# Altium PCB LED_Control.PcbDoc (part 3 of 3)
Units mil, origin at the board's own origin, x right, y up, seen from the top; angles counter-clockwise.
Board outline 2900 x 5000 mil, 4 copper layers (Top Layer, GND1, GND2, Bottom Layer), stack 51.864 mil thick; 163 components, 141 nets, 650 pads, 368 vias.
Unrouted connection lines stored in the file: 67.
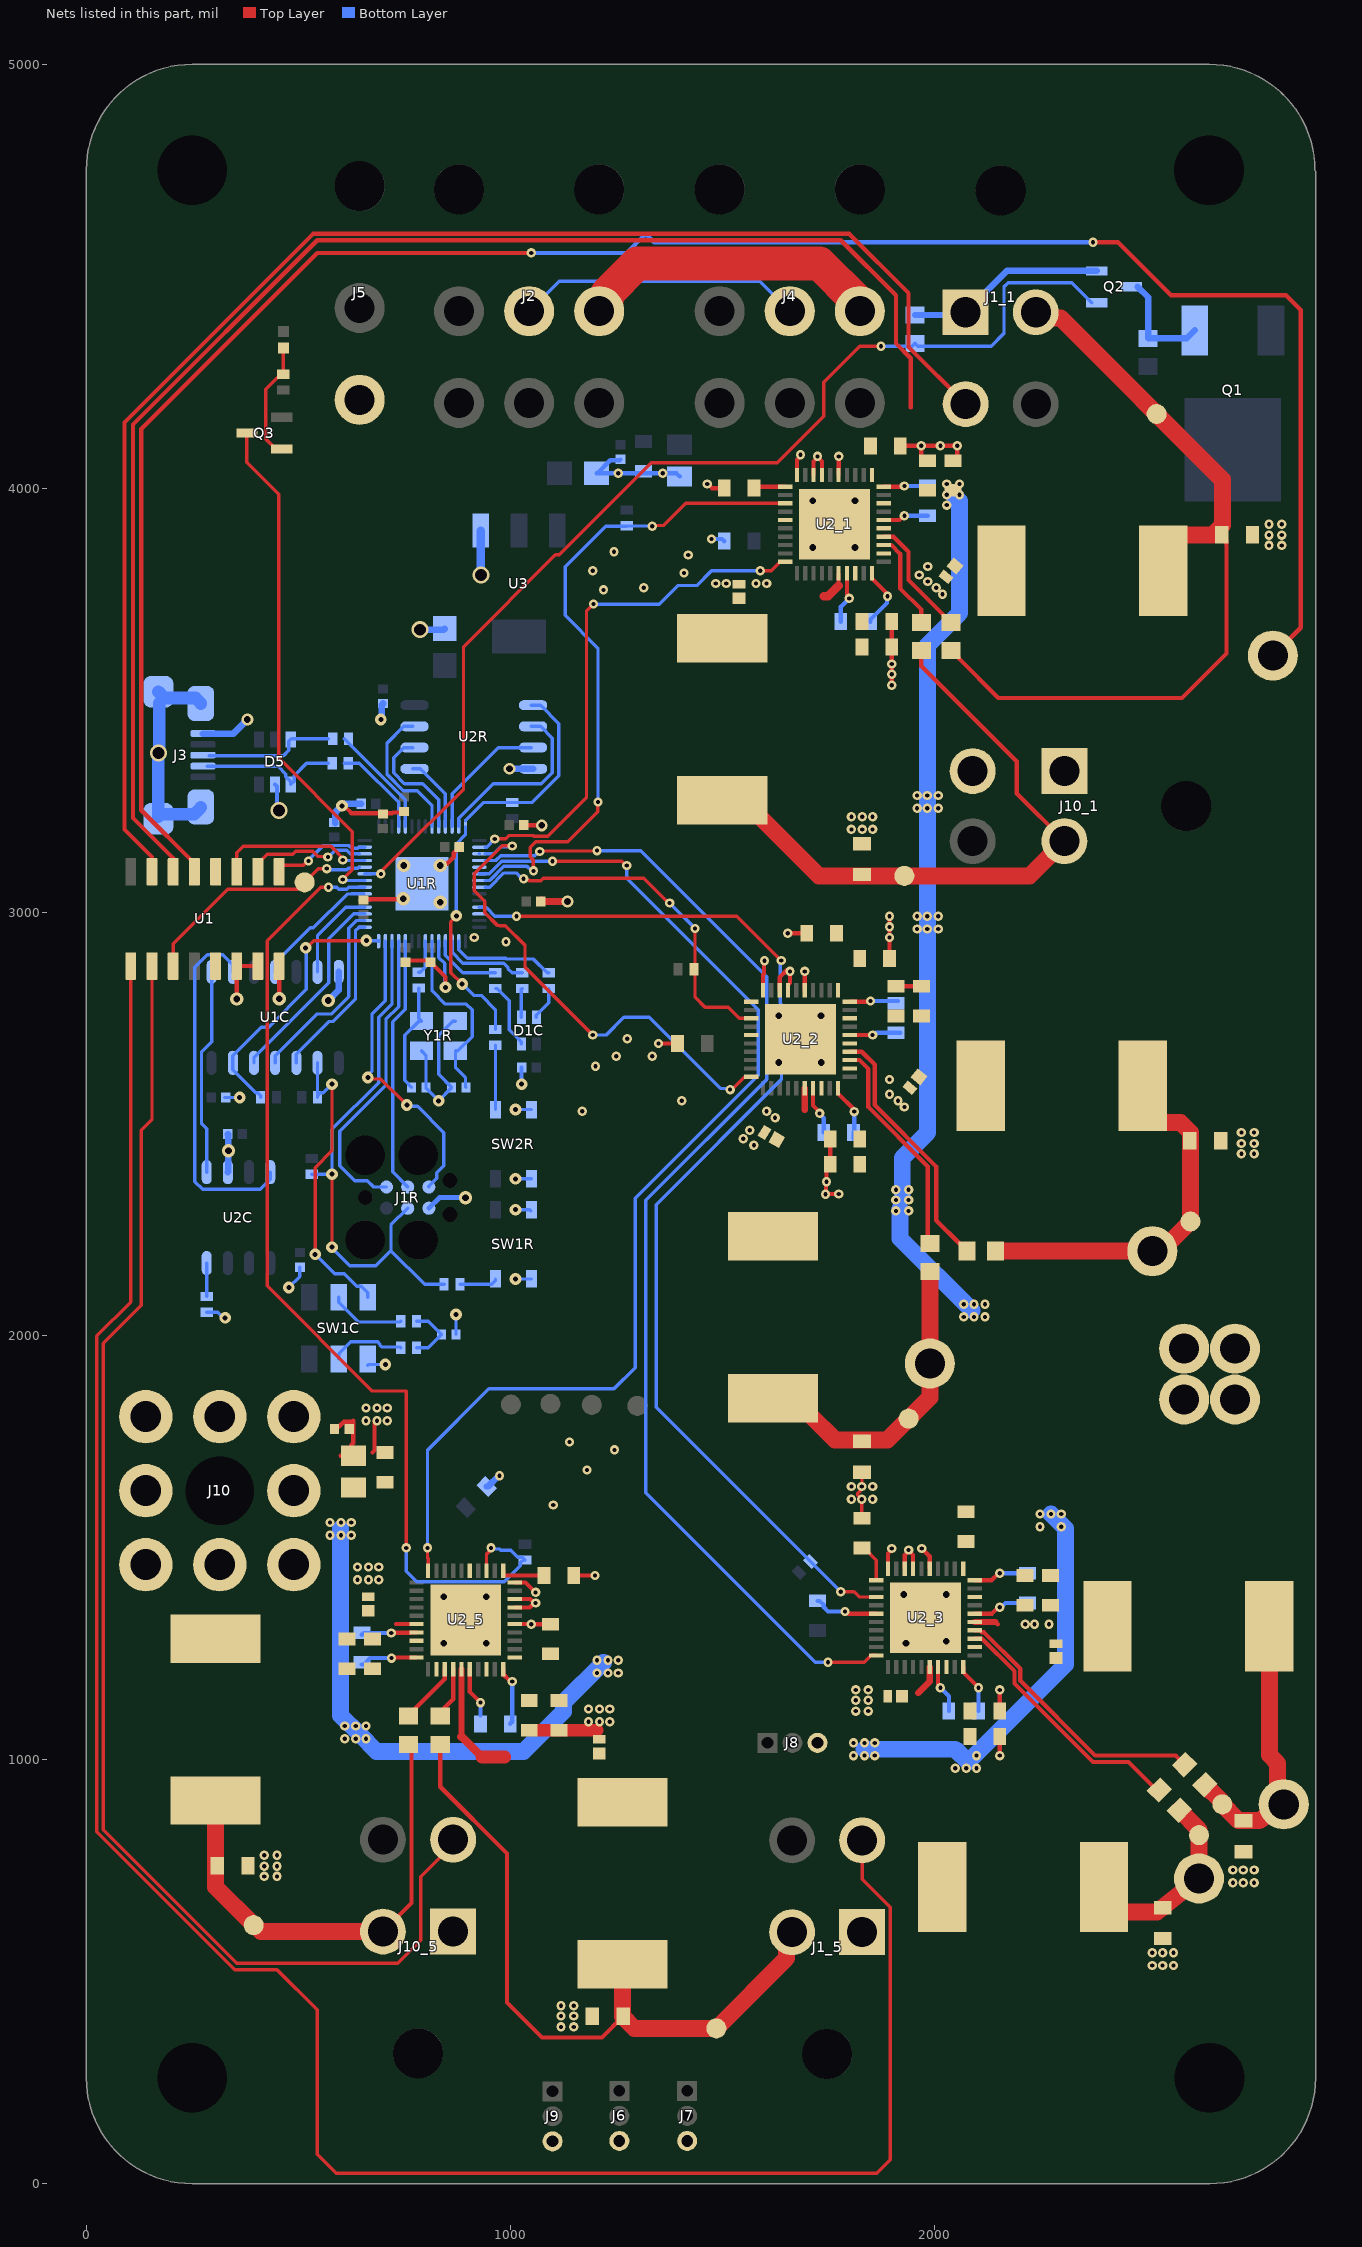
[diagram p4: the nets of this part, all layers, seen from the top]

## Via types
v1: diameter 22, hole 10, Top Layer to Bottom Layer, tented both sides, 231 vias
v2: diameter 22, hole 10, Top Layer to Bottom Layer, 60 vias
v3: diameter 27.56, hole 11.81, Top Layer to Bottom Layer, tented both sides, 33 vias
v4: diameter 31.5, hole 15.75, Top Layer to Bottom Layer, tented both sides, 27 vias
v5: diameter 40, hole 28, Top Layer to Bottom Layer, tented both sides, 6 vias
v6: diameter 28, hole 16, Top Layer to Bottom Layer, tented both sides, 4 vias
v7: diameter 45.28, hole 27.56, Top Layer to Bottom Layer, tented both sides, 4 vias
v8: diameter 40, hole 20, Top Layer to Bottom Layer, tented both sides, 3 vias

## Nets (pads, with @x,y where several pads share a name; then routed paths per layer and width w, separated by ;. In a path a pad name is that pad's centre, name@x,y a point inside that pad or via, vN(x,y) a via of type N, cw(c..) or ccw(c..) an arc to the next point about the centre after c; other vN are vias at no path point) (continued)
_V+: C4.1 C5.1 C6.1 C10_1.1 C10_2.1 C10_3.1 C10_5.1 C16_1.2 C16_2.2 C16_3.2 C16_5.2 C17_1.1 C17_2.1 C17_3.1 C17_5.1 C18_1.2 C18_2.2 C18_3.2 C18_5.2 C19_1.1 C19_2.1 C19_3.1 C19_5.1 J2.3 J4.3 J10.1 U2_1.18 U2_1.28 U2_1.31 U2_2.18 U2_2.28 U2_2.31 U2_3.18 U2_3.28 U2_3.31 U2_5.18 U2_5.28 U2_5.31 | length 4882.2
  Top Layer w80: J2.3@1210,4417.6 1210,4427.91 1229.06,4446.97 1229.06,4459.45 1299.6,4530 1729.8,4530 1817.71,4442.09 1817.71,4424.89 J4.3@1825,4417.6
  Bottom Layer w40: 600,1545 600,1105 645.4,1059.6 685,1020 1031.57,1020 1125.78,1114.22 1125.78,1135.78 1220,1230 ; 1835,1025 2050,1025 2080,995 2310,1225 2310,1545.8 v1(2275.8,1580) ; 1920,2300 1920,2230 2090,2060 ; 1925,2330 1925,2420 1985,2480 v1@1985,2950 ; 1984.53,2973.83 1984.53,3629.53 2060,3705 2060,3970 2050,3980 2045,3985
  other v1: 2050,980 2075.8,980 2100,980 1810,1010 1835.8,1010 1860,1010 2100,1010 1810,1040 1835.8,1040 1860,1040 610,1050 635.8,1050 660,1050 610,1080 635.8,1080 660,1080 1205,1205 1230.8,1205 1255,1205 1205,1235 1230.8,1235 1255,1235 575,1530 600.8,1530 625,1530 2250,1550 2300,1550 575,1560 600.8,1560 625,1560 2250,1580 2300,1580 2070,2045 2094.2,2045 2120,2045 2070,2075 2094.2,2075 2120,2075 1910,2295 1940,2295 1910,2320.8 1940,2320.8 1910,2345 1940,2345 1960,2960 1984.2,2960 2010,2960 1960,2990 1984.2,2990 2010,2990 1960,3245 1984.2,3245 2010,3245 1960,3275 1984.2,3275 2010,3275 2030,3960 2030,3984.2 2060,3984.2 2030,4010 2060,4010
CANCLK_RP2CAN: U1C.6 U1R.32 | length 224.7
  Bottom Layer w7.87: U1C.6@545.67,2858.86 545.67,2944.87 612.22,3011.42 U1R.32@656.79,3011.42
CANRX_RP2CAN: U1C.2 U2C.4 | length 845.6
  Bottom Layer w7.87: U1C.2@345.67,2858.86 345.67,2875.59 322.05,2899.21 285.88,2899.21 256.1,2869.43 256.1,2364.23 274.27,2346.06 410.43,2346.06 434.06,2369.69 U2C.4@434.06,2386.42
CANTX_RP2CAN: U1C.1 U2C.1 | length 487.4
  Bottom Layer w7.87: U2C.1@284.06,2386.42 284.06,2488.76 271.85,2500.97 271.85,2670.61 295.67,2694.43 U1C.1@295.67,2858.86
CSN0: R4_1.2 U1R.7 U2_1.3 | length 1577.7
  Top Layer w8: v1(1054.89,3097.13) 1054.89,3122.75 1047.13,3130.51 1047.13,3152.35 1060.53,3165.75 1135.75,3165.75 1206.47,3236.47 1206.47,3258.82 v1(1207.13,3259.47) ; v1(1335,3910) 1337,3912 1362,3912 1385,3935 1414.22,3964.22 U2_1.3@1649,3964.22
  Bottom Layer w8: U1R.7@940.68,3074.47 951.34,3074.47 985.33,3108.46 1039.77,3108.46 1051.1,3097.13 v1(1054.89,3097.13) ; v1(1207.13,3259.47) 1207.13,3622.87 1130,3700 1130,3815 1225,3910 1275,3910 1275.65,3910.65 1334.35,3910.65 v1(1335,3910)
CSN1: R4_2.2 U1R.8 U2_2.3 | length 884.1
  Top Layer w8: v1(1031.67,3078.32) 1034.35,3075.65 1044.02,3075.65 1045.42,3074.25 1071.98,3074.25 1077.73,3080 1315,3080 1373.83,3021.17 v1(1376.17,3021.17) ; v1(1436.17,2961.17) 1436.17,2880 1436.17,2860 1436.17,2798.83 1459.62,2775.38 1514.62,2775.38 1540.78,2749.22 U2_2.3@1569,2749.22
  Bottom Layer w8: U1R.8@940.68,3058.73 951.92,3058.73 985.41,3092.21 1014,3092.21 1027.89,3078.32 v1(1031.67,3078.32) ; v1(1376.17,3021.17) v1(1436.17,2961.17)
CSN2: R4_3.2 U1R.11 U2_3.3 | length 2647.4
  Top Layer w8: v1(1015,2990) 1535,2990 v1(1639.43,2885.56) ; v1(1779.96,1396.49) 1811.24,1396.49 1823.51,1384.22 U2_3.3@1864,1384.22
  Bottom Layer w8: U1R.11@927.46,3011.42 940.62,3011.42 943.43,3008.61 946.11,3008.61 953.68,3001.03 953.68,3000 963.68,2990 v1(1015,2990) ; v1(1639.43,2885.56) 1637.13,2883.26 1637.13,2785.5 1640,2782.62 1640,2605 1345,2310 1345,1831.45 R4_3.2@1708.22,1468.22 v1(1779.96,1396.49)
CSN3: U1R.12
CSN4: R4_5.2 U1R.35 U2_5.3 | length 2422.4
  Top Layer w8: v1(571.64,3058.36) 553.36,3058.36 426.8,2931.8 426.8,2118.2 675,1870 755,1870 v1(755,1500) ; U2_5.3@944.23,1446 944.23,1485.44 955,1496.21 v1(955,1500)
  Bottom Layer w8: v1@570,3060 v1(571.64,3058.36) 591.39,3058.36 595.73,3054.01 614.68,3054.01 619.33,3058.66 U1R.35@656.79,3058.66 ; v1(755,1500) 755,1445 780,1420 986.11,1420 1024.24,1458.13 1024.24,1464.47 R4_5.2@1032.89,1473.13 ; v1(955,1500) 957.68,1497.32 975.44,1497.32 977.94,1494.82 1001.09,1494.82 1017.79,1478.13 1028.17,1478.13 R4_5.2@1035,1471.3
DBG_TX_RP2040: J1R.5 U1R.27 | length 714.8
  Top Layer w7.87: v3(664.17,2609.84) 667.9,2606.12 695.09,2606.12 v3(756.32,2544.88)
  Bottom Layer w7.87: v3(664.17,2609.84) 664.17,2614.46 674.02,2624.3 674.02,2758.71 705.51,2790.21 U1R.27@705.51,2931.2 ; v3(756.32,2544.88) 759.47,2541.74 781.49,2541.74 843.7,2479.52 843.7,2401.35 826.83,2384.47 826.83,2371.44 808.27,2352.88 J1R.5@808.27,2351.38
DIN0: U1R.2 U2_1.10 | length 1246.5
  Top Layer w8: v1(963.7,3172.49) 964.26,3173.04 989.73,3173.04 997.35,3180.66 1053.79,3180.66 1055.77,3178.68 1088.68,3178.68 1180,3270 1180,3710 v1(1196.55,3726.55) ; v1(1589.89,3805) 1615.61,3805 1637,3826.39 U2_1.10@1649,3826.39
  Bottom Layer w8: U1R.2@940.68,3153.21 944.43,3153.21 v1(963.7,3172.49) ; v1(1196.55,3726.55) 1351.55,3726.55 1395.26,3770.26 1440.26,3770.26 1475,3805 v1(1589.89,3805)
DIN1: U1R.3 U2_2.10 | length 1170.7
  Top Layer w8: v1(1005,3155.96) 980.96,3155.96 915,3090 915,3050 940,3025 940,2998.33 970.09,2968.24 975.09,2968.24 975.65,2967.68 988.64,2967.68 1035,2921.33 1035,2870 v1(1195,2710) ; v1(1518.83,2581.17) 1522.61,2581.17 1551.83,2610.39 1568,2610.39 U2_2.10@1569,2611.39
  Bottom Layer w8: U1R.3@927.46,3137.4 U1R.3@927.52,3137.47 ; U1R.3@940.68,3137.4 960.96,3137.4 978,3154.44 1003.48,3154.44 v1(1005,3155.96) ; v1(1195,2710) 1226.38,2710 1268.44,2752.06 1327.94,2752.06 1496.15,2583.85 1516.15,2583.85 v1(1518.83,2581.17)
DIN2: U1R.4 U2_3.10 | length 2849.3
  Top Layer w8: v1(1070,3142.87) 1071.06,3143.94 1203.94,3143.94 v1(1205,3145) ; v1(1750,1230) 1835.61,1230 1852,1246.39 U2_3.10@1864,1246.39
  Bottom Layer w8: U1R.4@940.68,3121.65 965.88,3121.65 977.31,3133.09 1058.31,3133.09 1068.1,3142.87 v1(1070,3142.87) ; v1(1205,3145) 1307.65,3145 1605,2847.65 1605,2605 1320,2320 1320,1630 1720,1230 v1(1750,1230)
DIN3: U1R.5
DIN4: U1R.6 U2_5.10 | length 2652.9
  Top Layer w8: v1(805,1500) 805,1476.46 806.39,1475.07 U2_5.10@806.39,1446 ; v1(1100,3120) 1263.31,3120 1273.31,3110 v1(1275,3110)
  Bottom Layer w8: v1(805,1500) 805,1730 950,1875 1245,1875 1295,1925 1295,2325 1585,2615 1585,2770 1275,3080 v1(1275,3110) ; U1R.6@927.46,3090.16 U1R.6@927.46,3090.16 950.77,3090.22 980.55,3120 v1(1100,3120)
FAN_SWITCH: Q2.1 R3.1 U1R.37 | length 2630.1
  Top Layer w8: v1(695,3090) 695,3093.79 700.76,3099.55 700.76,3100.77 714.11,3114.12 730.54,3130.56 730.63,3130.56 890,3289.93 890,3626.32 1106.84,3843.16 1115.51,3843.16 1332.35,4060 1630,4060 1740,4170 1740,4250 1825,4335 v1(1875,4335)
  Bottom Layer w8: U1R.37@656.79,3090.16 656.85,3090.1 694.9,3090.1 v1(695,3090) ; v1(1875,4335) 1948.5,4335 R3.1@1955,4341.5 1961.5,4335 2135,4335 2165,4365 2165,4475.31 2174.69,4485 2325,4485 Q2.1@2372.5,4437.5
FB1_1: C8_1.1 J1_1.2 L1_1.1 R5_1.1 TP1_1.TP | length 1970.7
  Top Layer w10: R5_1.1@2040,3616.5 2042.5,3616.5 2057.5,3601.5 2057.5,3599 2151.5,3505 2585,3505 2690,3610 2690,3868.47 2689.33,3869.14 2689.33,3879.25 C8_1.1@2678.58,3890 ; C8_1.1@2680,3890 2680,3912.61
  Top Layer w40: J1_1.2@2240,4415 2253.06,4401.94 2298.06,4401.94 2680,4020 2680,3912.61 2666.2,3898.8 2656.57,3889.18 2578,3889.18 2541,3852.18 L1_1.1@2541,3805
FB1_2: C8_2.1 L1_2.1 pad.2@2515,2200 R5_2.1 TP1_2.TP | length 886.6
  Top Layer w40: R5_2.1@2145,2200 2535,2200 TP1_2.TP@2605,2270 2605,2460 2605,2480.07 2581.57,2503.5 2529,2503.5 2492,2540.5 L1_2.1@2492,2590
FB1_3: C8_3.1 L1_3.1 pad.2@2825,895 R5_3.1 TP1_3.TP | length 649
  Top Layer w40: R5_3.1@2638.69,941.31 2678.61,901.39 2678.61,896.39 2718.58,856.42 C8_3.1@2730,856.42 2766.72,856.42 pad.2@2825,895 ; L1_3.1@2791,1315 2791,1011 2810.05,991.95 pad.2@2810.05,909.95
FB1_4: 
FB1_5: C8_5.1 J1_5.2 L1_5.1 R5_5.1 TP1_5.TP | length 1660.3
  Top Layer w10: R5_5.1@835,1036.5 835,936.65 992.73,778.92 992.73,427.27 1075,345 1216.42,345 C8_5.1@1266.42,395
  Top Layer w40: L1_5.1@1265,518 1265,395 1293.58,366.42 1340,366.42 TP1_5.TP@1486.42,366.42 1651.94,531.94 1651.94,580.4 J1_5.2@1665,593.46
FB2_1: C11_1.1 J10_1.2 L2_1.1 R6_1.1 TP2_1.TP | length 1504.6
  Top Layer w10: R6_1.1@1970,3616.5 1970,3580 2195,3355 2195,3279.92 J10_1.2@2307.6,3167.32
  Top Layer w40: L2_1.1@1500,3264 1549.5,3264 1728.19,3085.31 1830,3085.31 TP2_1.TP@1930,3085.31 2225.59,3085.31 J10_1.2@2307.6,3167.32
FB2_2: C11_2.1 L2_2.1 pad.2@1990,1935 R6_2.1 TP2_2.TP | length 749.4
  Top Layer w40: L2_2.1@1620,1853 1669.5,1853 1706.5,1816 1706.5,1814.5 1766,1755 1830,1755 1890,1755 1990,1855 pad.2@1990,1935 R6_2.1@1990,2151.5
FB2_3: C11_3.1 L2_3.1 pad.2@2625,720 R6_3.1 TP2_3.TP | length 469.5
  Top Layer w40: L2_3.1@2401,700 2401,677.99 2438,640.99 2525.99,640.99 2539.63,651.88 pad.2@2625,720 2625,810 2625,835 R6_3.1@2578.69,881.31
FB2_4: 
FB2_5: C11_5.1 J10_5.2 L2_5.1 R6_5.1 TP2_5.TP | length 1116.7
  Top Layer w10: J10_5.2@700,595 767.01,662.01 767.01,1024.49 R6_5.1@755,1036.5
  Top Layer w40: L2_5.1@305,904 305,750 305,700 TP2_5.TP@395,610 396.96,610 411.96,595 J10_5.2@700,595
GND_RP2CAN: C1.2 C1C.2 C1R.2 C2.2 C2C.1 C2R.2 C3.2 C3C.2 C3R.2 C4.2 C4C.2 C4R.2 C5.2 C5C.2 C5R.2 C6.2 C6R.2 C7_1.1 C7_2.1 C7_3.1 C7_5.1 C7R.2 C8_1.2 C8_2.2 C8_3.2 C8_5.2 C8R.2 C9_1.2 C9_2.2 C9_3.2 C9_5.2 C9R.2 C10_1.2 C10_2.2 C10_3.2 C10_5.2 C10R.2 C11_1.2 C11_2.2 C11_3.2 C11_5.2 C11R.2 C12R.2 C13.2 C13R.2 C14.2 C16_1.1 C16_2.1 C16_3.1 C16_5.1 C17_1.2 C17_2.2 C17_3.2 C17_5.2 C18_1.1 C18_2.1 C18_3.1 C18_5.1 C19_1.2 C19_2.2 C19_3.2 C19_5.2 D1_1.2 D1_2.2 D1_3.2 D1_5.2 D2_1.2 D2_2.2 D2_3.2 D2_5.2 D5.2 J1_1.1 J1_5.1 J1R.6 J2.2 J3.5 J3.6 J3.7 J3.8 J3.9 J4.2 J5.2 J6.3 J7.3 J8.3 J9.3 J10_1.1 J10_5.1 pad.2@2590,1850 pad.2@2590,1970 pad.2@2710,1850 pad.2@2710,1970 Q2.2 R3.2 R6C.2 SW1C.6 SW1R.B1 SW1R.B2 SW2R.B1 SW2R.B2 U1.6 U1.7 U1.8 U1C.7 U1R.19 U1R.57 U2_1.5 U2_1.22 U2_1.35 U2_1.37 U2_1.38 U2_1.40 U2_1.41 U2_2.5 U2_2.22 U2_2.35 U2_2.37 U2_2.38 U2_2.40 U2_2.41 U2_3.5 U2_3.22 U2_3.35 U2_3.37 U2_3.38 U2_3.40 U2_3.41 U2_5.5 U2_5.22 U2_5.35 U2_5.37 U2_5.38 U2_5.40 U2_5.41 U2C.2 U2R.4 U3.1 Y1R.2 Y1R.4 | length 6922.2
  Top Layer w8: v1(1829.2,1615) 1829.2,1570.8 C7_3.1@1830,1570 ; v1@1830,1615 1829.6,1615 1820,1624.6 1820,1628.79 1826.52,1635.31 1826.52,1641.52 1830,1645 C11_2.2@1830,1678.58
  Top Layer w9.84: v3(603.15,3250.59) 607.94,3250.59 625.27,3233.27 721.26,3233.27 723.16,3235.17 748.1,3235.17 C5R.2@750,3237.08 ; C9R.2@654.33,3028.54 655.92,3030.13 745.89,3030.13 v4(747.48,3031.72) ; C12R.2@754.76,2885.83 C8R.2@811.92,2885.83 ; C8R.2@811.92,2881.93 812.7,2881.93 818.81,2875.83 818.81,2875.04 847.24,2846.6 v3(847.24,2822.44) ; v4(835.43,3109.84) 839.58,3113.99 850.64,3113.99 866.81,3130.16 866.81,3139.06 880.12,3152.36 C13R.2@880.12,3153.15 ; C7R.2@1032.13,3205 1032.35,3204.78 1074.3,3204.78 v6(1074.53,3204.55)
  Top Layer w10: v4(355,2795) U1.6@355,2872.56 U1.7@405,2872.56 ; U1.8@455,2872.56 455.13,2872.43 455.13,2795.64 v4(455.25,2795.52) ; 590,1780 590,1780.79 596.02,1786.81 596.81,1786.81 607.7,1797.7 627.7,1797.7 630,1800 630,1747.4 624.53,1741.93 624.53,1739.96 601.97,1717.4 600,1717.4 ; 675,1725 680,1730 v1@680,1800 ; U2_5.35@1011,1320.15 1049.85,1320.15 v2(1050,1320) C10_5.2@1095,1320 ; U2_5.37@1011,1359.54 1046.29,1359.54 v2@1056.75,1370 ; U2_5.38@1011,1379.22 1047.53,1379.22 v2@1056.75,1370 ; U2_5.40@1011,1418.61 1036.39,1418.61 v2(1060,1395) ; v2(1060,1370) v2@1056.75,1370 ; C7_5.1@1150,1435 v2(1200,1435) ; v2(1350,2690) C9_2.2@1395,2690 ; v2(1465,4010) 1466.4,4010 1476.4,4000 C7_1.1@1505,4000 ; U2_2.40@1596.39,2816 1596.39,2851.83 1598.56,2854 1598.56,2883.56 v2(1600,2885) ; U2_2.38@1635.78,2816 1635.78,2845.78 v2@1652.6,2862.61 ; v2(1655,2950) C7_2.1@1700,2950 ; U2_2.37@1655.46,2816 1655.46,2828 1660,2832.53 v2(1660,2860) ; U2_1.40@1676.39,4031 1676.39,4066.83 1685.07,4075.51 v2(1685.07,4078.75) ; U2_2.35@1694.85,2816 1694.85,2833.84 1695,2834 v2(1695,2860) ; U2_1.38@1715.78,4031 1715.78,4063.14 1725,4072.37 v2(1725,4075) ; v2@1725,4073.47 1735.46,4063 U2_1.37@1735.46,4031 ; C19_2.2@1755,2465 C18_2.1@1755,2405 1746.25,2396.25 1746.25,2361.22 1745.12,2360.1 1745.12,2335.43 v2(1744,2334.31) 1744.69,2335 v2(1775,2335) ; U2_1.35@1774.85,4031 1774.85,4048.84 1775,4049 v2(1775,4075) ; v2(1790,1350) 1793.25,1350 1798.4,1344.85 U2_3.5@1864,1344.85 ; U2_3.40@1891.39,1451 1891.39,1486.83 1900.07,1495.51 v2(1900.07,1498.75) ; C10_2.2@1895,2890 v2(1895,2940) v2(1895,2990) ; v1(1900,3535) v1(1900,3560.8) v1(1900,3585) C18_1.1@1900,3625 C19_1.2@1900,3685 ; C16_2.1@1910,2825 C17_2.2@1970,2825 ; C10_1.2@1920,4100 v2(1970,4100) ; U2_3.38@1930.78,1451 1930.78,1483.14 1940,1492.37 v2(1940,1495) ; v2@1940,1493.46 1950.46,1483 U2_3.37@1950.46,1451 ; v2(1971.13,1498.75) 1989.85,1480.04 U2_3.35@1989.85,1451 ; C16_1.1@1985,4065 1980,4065 1970,4075 v2(1970,4100) ; C17_1.2@2045,4065 2055,4075 v2(2055,4100) v2(2015,4100) v2(1970,4100) ; v2(2155,1010) C19_3.2@2155,1055 ; C18_3.1@2155,1115 v2(2155,1165)
  Top Layer w16: C6R.2@1072.13,3028.81 1075.15,3028.81 1078.96,3025 v6(1135,3025)
  Top Layer w30: C17_5.2@1045,1070 C16_5.1@1115,1070 1205,1070
  Bottom Layer w7.87: R6C.2@284.06,2055.71 310.63,2055.71 323.43,2042.91 v3(327.56,2042.91) ; v3(477.79,2114.4) 503.47,2140.09 503.47,2161.98 C3C.2@503.94,2162.44 ; SW1C.6@664.17,1930.71 666.14,1932.68 v3(705.51,1932.68) ; U1R.19@831.5,2931.2 831.5,2892.7 845.42,2878.79 845.42,2824.27 v3(847.24,2822.44) ; U1R.57@831.5,3019.29 v4(835.43,3023.23) ; C2C.1@872.24,2003.54 v3(872.24,2050.79) ; v3(1012.6,2134.45) SW1R.B2@1050,2134.45 ; v3(1012.6,2297.84) 1046.14,2297.84 SW1R.B1@1046.26,2297.95 ; v3(1012.6,2370.67) SW2R.B2@1050,2370.67 ; v3(1012.6,2534.06) SW2R.B1@1050,2534.06 ; J2.2@1044.65,4417.6 1115.51,4488.46 1588.78,4488.46 J4.2@1659.65,4417.6
  Bottom Layer w8: C1C.2@326.81,2562.6 C1C.2@328.94,2562.6 v3(361.81,2562.6) ; Y1R.2@790.87,2672.84 801.38,2662.32 C2R.2@801.38,2586.22 801.38,2585.43 v3@831.5,2555.32 ; v3(831.5,2554.73) v3@831.5,2555.32 ; Y1R.4@870.87,2742.84 864.96,2742.84 831.43,2709.31 831.43,2617.19 861.61,2587.01 C1R.2@861.61,2586.22 861.61,2585.43 v3@831.5,2555.32 ; SW1R.B1@1046.26,2297.95 SW1R.B1@1048.94,2295.28
  Bottom Layer w9.84: v3(1026.97,2594.1) C5C.2@1026.97,2633.47
  Bottom Layer w10: D5.2@445,3301.05 450,3296.05 450,3244.2 v5(455,3239.2) ; C13.2@1203.52,4035 C13.2@1205.5,4035 ; C3.2@1260,4067.87 1257.82,4065.69 1236.19,4065.69 C13.2@1205.5,4035 ; C2.2@1400,4027.6 1392.6,4035 v1(1360,4035) v1(1255,4035) C13.2@1205.5,4035 ; v2(1475,3880) 1500,3880 C9_1.2@1505,3875 ; C9_3.2@1725,1375 1730,1375 1740,1365 1740,1360 1750,1350 v2@1781.13,1350
  Bottom Layer w11.81: J1R.6@808.27,2301.38 833.18,2326.29 v4(894.81,2326.29)
  Bottom Layer w15: C9_5.2@944.75,1644.75 947.85,1644.75 973.11,1670 v2(975,1670) ; R3.2@1955,4408.5 2068.15,4408.5 J1_1.1@2074.65,4415 2172.15,4512.5 Q2.2@2384,4512.5
  Bottom Layer w15.75: U2C.2@334.06,2386.42 334.74,2387.11 334.74,2435.93 v4(335.43,2436.62) 334.74,2437.3 334.74,2475.3 C4C.2@334.06,2475.99 ; v4(571.12,2791.48) 595.67,2816.02 U1C.7@595.67,2858.86 ; C10R.2@587.4,3209.65 587.18,3209.87 587.18,3234.62 v3(603.15,3250.59) 606.35,3250.59 611.27,3255.51 C4R.2@649.02,3255.51 ; v3(694.83,3454.09) 697.09,3456.35 697.09,3489.17 C3R.2@700,3492.08 ; v6(998.72,3337.99) U2R.4@1053.99,3337.99
  Bottom Layer w16: J3.5@275.31,3420.38 346.18,3420.38 v6(380,3454.2) ; v5(786.92,3666.12) 843.4,3666.12 C14.2@845.8,3668.52
  Bottom Layer w20: U3.1@930.25,3900 930.52,3899.72 930.52,3795.28 v5(930.8,3795)
  Bottom Layer w30: J3.8@170,3519.61 184.61,3505 257.44,3505 J3.7@270.39,3492.05 ; J3.8@171.91,3492.05 171.91,3376.91 v5(170,3375) 170,3225.39 175.12,3230.51 253.95,3230.51 270.39,3246.95 J3.6@270.39,3247.15
  other v1: 1120,370 1150,370 1120,395.8 1150,395.8 1120,420 1150,420 2515,515 2539.2,515 2565,515 2515,545 2539.2,545 2565,545 2705,710 2729.2,710 2755,710 420,725 450,725 2705,740 2729.2,740 2755,740 420,749.2 450,749.2 420,775 450,775 1185,1090 1210.8,1090 1235,1090 1815,1115 1845,1115 1185,1120 1210.8,1120 1235,1120 1815,1140.8 1845,1140.8 1815,1165 1845,1165 2215,1320 2236.92,1320 2271.13,1320 640,1425 665.8,1425 690,1425 640,1455 665.8,1455 690,1455 1101.71,1601.17 1805,1615 1855,1615 1805,1645 1829.2,1645 1855,1645 1181.17,1683.83 1246.17,1731.17 1140,1750 660,1800 685.8,1800 710,1800 660,1830 685.8,1830 710,1830 2725,2430 2755,2430 1575,2450 2725,2454.2 2755,2454.2 1550,2465 2725,2480 2755,2480 1565,2485 1625,2515 1170,2530 1605,2530 1930,2540 1405,2555 1915,2555 1895,2570 1895,2605 1201.17,2636.17 1250,2660 1335,2660 1276.17,2701.17 990,2930 915,2940 1805,3195 1830.8,3195 1855,3195 1805,3225 1830.8,3225 1855,3225 2020,3750 1220,3760 1315,3765 2005,3765 1485,3775 1510,3775 1580,3775 1605,3775 1985,3780 1965,3795 1410,3800 1195,3805 1985,3815 1420.15,3842.13 1245,3850 2790,3865 2820,3865 2790,3889.2 2820,3889.2 2790,3915 2820,3915
  other v2: 1746.25,2363.69 1895,2965
  other v4: 843.55,1274.95 943.55,1274.95 1933.76,1274.74 2028.55,1279.95 843.5,1385 943.5,1385 1928.5,1390 2028.5,1390 1633.55,2644.95 1733.55,2644.95 1633.5,2755 1733.5,2755 748.86,3109.8 1713.55,3859.95 1813.55,3859.95 1713.5,3970 1813.5,3970
INT_RP2CAN: U1C.4 U1R.34 | length 297.2
  Bottom Layer w7.87: U1C.4@445.67,2858.86 445.67,2879.85 528.52,2962.7 535.74,2962.7 615.57,3042.53 625.73,3042.53 626.12,3042.91 U1R.34@654.33,3042.91
Leak_Detect: Q3.3 U1R.36 | length 1218.2
  Top Layer w8: Q3.3@379,4130 379,4061 453.94,3986.06 453.94,3363.52 627.87,3189.59 627.87,3099.55 v1(605.21,3076.89)
  Bottom Layer w8: v1(605.21,3076.89) 607.62,3074.47 656.73,3074.47 U1R.36@656.79,3074.41
LEDB_RP2CAN: R8C.1 U1R.18 | length 168.1
  Bottom Layer w7.87: U1R.18@847.24,2931.2 847.24,2898.35 888.7,2856.89 R8C.1@965.35,2856.89
LEDG_RP2CAN: R7C.1 U1R.17 | length 213.3
  Bottom Layer w7.87: U1R.17@862.99,2931.2 862.99,2904.87 888.33,2879.53 985.01,2879.53 994.87,2869.67 994.87,2866.75 1004.72,2856.89 R7C.1@1028.35,2856.89
LEDR_RP2CAN: R5C.1 U1R.16 | length 255
  Bottom Layer w7.87: U1R.16@878.74,2931.2 878.74,2911.39 899.19,2890.95 989.74,2890.95 991.44,2889.25 1055.05,2889.25 1087.4,2856.89 R5C.1@1091.34,2856.89
MISO_RP2CAN: U1C.12 U1R.31 | length 475
  Bottom Layer w7.87: U1C.12@395.67,2644.29 395.67,2656.76 572.05,2833.14 572.05,2937.26 630.46,2995.67 U1R.31@656.79,2995.67
MOSI_RP2CAN: U1C.11 U1R.30 | length 454.6
  Bottom Layer w7.87: U1C.11@445.67,2644.29 445.67,2661.03 544.09,2759.45 578.07,2759.45 619.29,2800.67 619.29,2962.23 636.98,2979.92 U1R.30@656.79,2979.92
nCS_RP2CAN: R4C.2 U1C.13 U1R.28 | length 646.2
  Top Layer w7.87: v3(517.74,2915.73) 520.03,2915.73 536.98,2932.68 v3(660.63,2932.68)
  Bottom Layer w7.87: R4C.2@411.22,2562.6 411.22,2566.54 404.33,2573.43 399.8,2573.43 345.67,2627.56 U1C.13@345.67,2644.29 345.67,2661.03 412.86,2728.21 430.18,2728.21 519.29,2817.32 519.29,2914.17 v3(517.74,2915.73) ; v3(660.63,2932.68) 689.76,2932.68 U1R.28@689.76,2931.2
NetC2C_2: C2C.2 R2C.2 R3C.2 | length 144.3
  Bottom Layer w7.87: R3C.2@779.33,1972.05 807.28,1972.05 837.99,2002.76 C2C.2@837.99,2003.54 837.99,2004.33 807.28,2035.04 R2C.2@779.33,2035.04
NetC2R_1: C2R.1 R1R.2 Y1R.3 | length 263.4
  Bottom Layer w8: C2R.1@767.13,2586.22 767.13,2587.01 751.43,2602.7 751.43,2709.31 784.96,2742.84 Y1R.3@790.87,2742.84 784.25,2749.45 R1R.2@784.25,2820.55
NetC7_1_2: C7_1.2 U2_1.1 | length 75.5
  Top Layer w10: C7_1.2@1575,4000 1578.61,4003.61 U2_1.1@1649,4003.61
NetC7_2_2: C7_2.2 U2_2.1
NetC7_3_2: C7_3.2 U2_3.1 | length 93.4
  Top Layer w8: C7_3.2@1830,1500 1835,1500 1864,1471 U2_3.1@1864,1423.61
NetC7_4_2: 
NetC7_5_2: C7_5.2 U2_5.1 | length 107.4
  Top Layer w10: U2_5.1@983.61,1446 983.61,1435 C7_5.2@1080,1435
NetC12_1_1: C12_1.1 U2_1.30 | length 104.6
  Top Layer w10: U2_1.30@1881,4003.61 1928.61,4003.61 v2(1930,4005)
  Bottom Layer w10: v2(1930,4005) C12_1.1@1985,4005
NetC12_1_2: C12_1.2 U2_1.26 | length 96.2
  Top Layer w10: U2_1.26@1893,3924.84 1918.14,3924.84 1928.3,3935 v2(1930,3935)
  Bottom Layer w10: v2(1930,3935) C12_1.2@1985,3935
NetC12_2_1: C12_2.1 U2_2.30 | length 114.6
  Top Layer w10: U2_2.30@1801,2788.61 1848.61,2788.61 v2(1850,2790)
  Bottom Layer w10: v2(1850,2790) C12_2.1@1915,2790
NetC12_2_2: C12_2.2 U2_2.26 | length 121.1
  Top Layer w10: U2_2.26@1801,2709.84 1828.85,2709.84 1829,2710 v2(1855,2710)
  Bottom Layer w10: v2(1855,2710) 1858.25,2710 1863.25,2715 C12_2.2@1920,2715
NetC12_3_1: C12_3.1 U2_3.30 | length 130.8
  Top Layer w10: U2_3.30@2096,1423.61 2135.36,1423.61 2151.75,1440 v2(2155,1440)
  Bottom Layer w10: v2(2155,1440) C12_3.1@2220,1440
NetC12_3_2: C12_3.2 U2_3.26 | length 134.4
  Top Layer w10: U2_3.26@2096,1344.85 2136.6,1344.85 2151.75,1360 v2(2155,1360)
  Bottom Layer w10: v2(2155,1360) 2158.25,1360 2168.25,1370 C12_3.2@2220,1370
NetC12_4_1: 
NetC12_4_2: 
NetC12_5_1: C12_5.1 U2_5.30 | length 142.5
  Top Layer w10: U2_5.30@983.61,1214 983.61,1202 998.31,1187.3 1002.7,1187.3 v2(1005,1185)
  Bottom Layer w10: C12_5.1@1000,1085 1005,1090 v2(1005,1185)
NetC12_5_2: C12_5.2 U2_5.26 | length 119.4
  Top Layer w10: U2_5.26@904.85,1214 904.85,1160.15 v2(930,1135)
  Bottom Layer w10: 930,1105 v2(930,1135)
NetC15_1_1: C15_1.1 U2_1.17 | length 124.5
  Top Layer w10: U2_1.17@1794.54,3799 1794.54,3748.71 1800,3743.25 v2(1800,3740)
  Bottom Layer w10: C15_1.1@1780,3685 1780,3720 v2(1800,3740)
NetC15_1_2: C15_1.2 U2_1.20 | length 145.6
  Top Layer w10: U2_1.20@1853.61,3799 1853.61,3787 1887.7,3752.9 1887.7,3747.3 v2(1890,3745)
  Bottom Layer w10: C15_1.2@1850,3685 1850,3690 1889.12,3729.12 1889.12,3744.12 v2(1890,3745)
NetC15_2_1: C15_2.1 U2_2.17 | length 114.5
  Top Layer w10: U2_2.17@1714.54,2584 1714.54,2543.71 1730,2528.25 v2(1730,2525)
  Bottom Layer w10: v2(1730,2525) 1730,2523.6 1740,2513.6 C15_2.1@1740,2480
NetC15_2_2: C15_2.2 U2_2.20 | length 135.4
  Top Layer w10: U2_2.20@1773.61,2584 1773.61,2572 1809.29,2536.31 1809.29,2531.48 v2(1811.59,2529.19)
  Bottom Layer w10: C15_2.2@1810,2465 C15_2.2@1810,2480 1811.59,2481.59 v2(1811.59,2529.19)
NetC15_3_1: C15_3.1 U2_3.17 | length 114.5
  Top Layer w10: U2_3.17@2009.54,1219 2009.54,1178.71 2015,1173.25 v2(2015,1170)
  Bottom Layer w10: v2(2015,1170) 2035,1150 C15_3.1@2035,1115
NetC15_3_2: C15_3.2 U2_3.20 | length 119.1
  Top Layer w10: U2_3.20@2068.61,1219 2068.61,1207 2105,1170.61 v2(2105,1170)
  Bottom Layer w10: C15_3.2@2105,1115 v2(2105,1170)
NetC15_4_1: 
NetC15_4_2: 
NetC15_5_1: C15_5.1 U2_5.17 | length 130.9
  Top Layer w10: v2(719.25,1299.34) 720,1300.09 763.69,1300.09 764.07,1300.46 U2_5.17@778.62,1300.46
  Bottom Layer w10: C15_5.1@650,1295 654.34,1299.34 v2(719.25,1299.34)
NetC15_5_2: C15_5.2 U2_5.20 | length 135.8
  Top Layer w10: v2(720,1240) 721.39,1241.39 U2_5.20@779,1241.39
  Bottom Layer w10: C15_5.2@650,1225 655,1225 670,1240 v2(720,1240)
NetD1C_1: D1C.1 R5C.2 | length 80.1
  Bottom Layer w7.87: D1C.1@1061.81,2751.58 1061.81,2756.5 1091.34,2786.03 R5C.2@1091.34,2819.49
NetD1C_2: D1C.2 R7C.2 | length 68.7
  Bottom Layer w7.87: D1C.2@1026.38,2751.58 1026.38,2817.52 R7C.2@1028.35,2819.49
NetD1C_3: D1C.3 R8C.2 | length 158.5
  Bottom Layer w7.87: R8C.2@965.35,2819.49 969.29,2819.49 997.83,2790.95 997.83,2722.05 1026.38,2693.51 D1C.3@1026.38,2688.58
NetQ1_1: Q1.1 Q2.3 R1.2 | length 249.7
  Bottom Layer w15: Q2.3@2480,4475 2505,4450 R1.2@2505,4353.5 2596,4353.5 Q1.1@2615,4372.5
NetQ3_1: Q3.1 R8.2 R9.2 | length 278.7
  Top Layer w8: Q3.1@461,4092.5 447,4092.5 423.5,4116 423.5,4233.07 465,4274.57 R9.2@465,4330.31
NetR2C_1: R2C.1 SW1C.2 | length 178.5
  Bottom Layer w7.87: SW1C.2@595.28,2091.38 595.28,2079.57 611.02,2063.82 611.18,2063.82 641.93,2033.07 739.96,2033.07 R2C.1@741.93,2035.04
NetR3C_1: R3C.1 SW1C.5 | length 177.5
  Bottom Layer w7.87: SW1C.5@595.28,1945.71 595.28,1957.52 619.3,1981.54 623.9,1986.14 687.56,1986.14 692.8,1980.91 692.8,1978.63 697.41,1974.02 739.96,1974.02 R3C.1@741.93,1972.05
NetR5_1_2: R5_1.2 U2_1.24 | length 283.1
  Top Layer w10: U2_1.24@1881,3885.47 1904.54,3885.47 1940,3850 1940,3783.5 2022.5,3701 2022.5,3698.5 2037.5,3683.5 R5_1.2@2040,3683.5
NetR5_2_2: R5_2.2 U2_2.24 | length 603.4
  Top Layer w10: U2_2.24@1801,2670.47 1829.54,2670.47 1860,2640 1860,2545 2005,2400 2005,2273 2060.5,2217.5 2063,2217.5 2078,2202.5 R5_2.2@2078,2200
NetR5_3_2: R5_3.2 U2_3.24 | length 643.1
  Top Layer w10: U2_3.24@2096,1305.46 2108,1305.46 2112.69,1300.78 2117.54,1300.78 2203.54,1214.77 2203.54,1186.46 2380,1010 2570,1010 R5_3.2@2591.31,988.69
NetR5_4_2: 
NetR5_5_2: R5_5.2 U2_5.24 | length 129
  Top Layer w10: R5_5.2@825.47,1103.04 827.97,1103.04 842.97,1118.04 842.97,1120.54 865.47,1143.04 U2_5.24@865.47,1214
NetR6_1_2: R6_1.2 U2_1.23 | length 229.8
  Top Layer w10: U2_1.23@1881,3865.78 1899.22,3865.78 1920,3845 1920,3763.5 1970,3713.5 R6_1.2@1970,3683.5
NetR6_2_2: R6_2.2 U2_2.23 | length 534
  Top Layer w10: U2_2.23@1801,2650.78 1824.22,2650.78 1845,2630 1845,2540 1985,2400 R6_2.2@1985,2206.6
NetR6_3_2: R6_3.2 U2_3.23 | length 594.1
  Top Layer w10: U2_3.23@2096,1285.78 2113.38,1285.78 2190,1209.16 2190,1180 2375,995 2458.5,995 R6_3.2@2525,928.5
NetR6_4_2: 
NetR6_5_2: R6_5.2 U2_5.23 | length 140.1
  Top Layer w10: R6_5.2@763.36,1108.36 763.36,1108.89 772.5,1118.04 773.03,1118.04 845.77,1190.78 U2_5.23@845.77,1214
NetR6C_1: R6C.1 U2C.8 | length 78.7
  Bottom Layer w7.87: R6C.1@284.06,2093.11 U2C.8@284.06,2171.85
NetR6R_1: R6R.1 SW1R.A2 | length 91.3
  Bottom Layer w7.87: R6R.1@881.69,2121.65 956.5,2121.65 965.35,2130.51 SW1R.A2@965.35,2134.45
NetR7R_1: R7R.1 SW2R.A1 | length 151.6
  Bottom Layer w7.87: SW2R.A1@965.35,2534.06 R7R.1@965.35,2685.63
Out1_1: D1_1.1 L1_1.2 U2_1.25
Out1_2: D1_2.1 L1_2.2 U2_2.25
Out1_3: D1_3.1 L1_3.2 U2_3.25 | length 56.1
  Top Layer w10: 2144.84,1325.15 2150,1320
  Top Layer w15: U2_3.25@2096,1325.15 2144.84,1325.15
Out1_4: 
Out1_5: D1_5.1 L1_5.2 U2_5.25 | length 281.5
  Top Layer w15: 885.15,1054.85 U2_5.25@885.15,1214
  Top Layer w20: 885.15,1054.85 933.49,1006.51
  Top Layer w30: 933.49,1006.51 987.44,1006.51
Out2_1: D2_1.1 L2_1.2 U2_1.16 | length 74.3
  Top Layer w10: 1774.85,3769.84 U2_1.16@1774.85,3799
  Top Layer w20: 1740,3745 1750,3745 1774.85,3769.84
Out2_2: D2_2.1 L2_2.2 U2_2.16 | length 51.1
  Top Layer w15: 1694.85,2532.94 U2_2.16@1694.85,2584
Out2_3: D2_3.1 L2_3.2 U2_3.16 | length 72.5
  Top Layer w15: 1962.7,1157.7 1989.85,1184.85 U2_3.16@1989.85,1219
Out2_4: 
Out2_5: D2_5.1 L2_5.2 U2_5.16 | length 48.1
  Top Layer w10: 730.94,1320.15 U2_5.16@779,1320.15
QSPI_SCLK_RP2040: U1R.52 U2R.6 | length 286.6
  Bottom Layer w7.87: U2R.6@770.47,3387.99 748.82,3387.99 725.2,3364.37 725.2,3328.21 750.65,3302.76 793.31,3302.76 831.5,3264.57 U1R.52@831.5,3201.87
QSPI_SD0_RP2040: U1R.53 U2R.5 | length 178.4
  Bottom Layer w7.87: U2R.5@770.47,3337.99 788.39,3337.99 847.24,3279.14 U1R.53@847.24,3201.87
QSPI_SD1_RP2040: U1R.55 U2R.2 | length 427.3
  Bottom Layer w7.87: U1R.55@878.74,3201.87 878.74,3221.68 959.82,3302.76 1073.82,3302.76 1099.27,3328.21 1099.27,3397.78 1099.21,3397.84 1099.21,3410.43 1071.65,3437.99 U2R.2@1050,3437.99
QSPI_SD2_RP2040: U1R.54 U2R.3 | length 309.4
  Bottom Layer w7.87: U1R.54@862.99,3201.87 862.99,3279.14 971.85,3387.99 U2R.3@1050,3387.99
QSPI_SD3_RP2040: U1R.51 U2R.7 | length 337.5
  Bottom Layer w7.87: U2R.7@770.47,3437.99 748.82,3437.99 709.45,3398.62 709.45,3324.6 747.53,3286.52 780.58,3286.52 815.75,3251.35 U1R.51@815.75,3201.87
QSPI_SS_RP2040: R5R.2 R7R.2 U1R.56 U2R.1 | length 1018.1
  Top Layer w7.87: v3(872.84,2991.09) 872.84,2989.47 860,2976.64 860,2856.93 v3(886.61,2830.32)
  Bottom Layer w7.87: v3(872.84,2991.09) 872.84,3160.41 894.49,3182.06 U1R.56@894.49,3201.87 ; v3(886.61,2830.32) 913.74,2803.19 932.15,2803.19 965.35,2769.99 R7R.2@965.35,2723.03 ; U1R.56@894.49,3215.16 937.8,3258.47 R5R.2@1004.72,3258.47 1051.8,3258.47 1115.02,3321.69 1115.02,3444.63 1071.65,3487.99 U2R.1@1050,3487.99
RUN_RP2040: J1R.4 R4R.2 R6R.2 U1R.26 | length 1275.3
  Top Layer w7.87: v3(579.53,2209.59) v3(579.53,2381.5)
  Bottom Layer w7.87: R4R.2@532.28,2381.5 v3(579.53,2381.5) 579.53,2487.04 689.76,2597.28 689.76,2752.19 721.26,2783.69 U1R.26@721.26,2931.2 ; v3(579.53,2209.59) 579.53,2208.27 621.85,2165.94 683.3,2165.94 718.7,2201.35 ; J1R.4@758.27,2301.38 718.7,2261.82 718.7,2201.35 ; R6R.2@844.29,2121.65 798.4,2121.65 718.7,2201.35
SCK_RP2CAN: U1C.10 U1R.29 | length 400.1
  Bottom Layer w7.87: U1C.10@495.67,2644.29 495.67,2664.54 573.04,2741.91 582.81,2741.91 635.04,2794.14 635.04,2955.71 643.5,2964.17 U1R.29@656.79,2964.17
SWCLK_RP2040: J1R.3 U1R.24 | length 606.9
  Bottom Layer w7.87: U1R.24@752.76,2931.2 752.76,2770.64 722.83,2740.72 722.83,2386.82 J1R.3@758.27,2351.38
SWDIO_RP2040: J1R.1 U1R.25 | length 718.6
  Bottom Layer w7.87: J1R.1@708.27,2351.38 677.73,2351.38 663.16,2365.94 633.23,2365.94 597.83,2401.35 597.83,2482.59 707.08,2591.85 707.08,2747.24 737.01,2777.16 U1R.25@737.01,2931.2
Temp0: pad.2@2799.4,3605 U1.13 | length 4935.9
  Top Layer w10: U1.13@255,3095 255,3114.68 129.69,3240 129.69,4139.69 545,4555 v2(1049.82,4555) ; v2(2375,4580) 2434.12,4580 2559.12,4455 2830,4455 2865,4420 2865,3670.61 pad.2@2799.4,3605
  Bottom Layer w10: v2(1049.82,4555) 1275,4555 1315.86,4595.86 1324.14,4595.86 1340,4580 v2(2375,4580)
Temp1: J10_1.3 U1.14 | length 3407.9
  Top Layer w10: U1.14@205,3095 205,3127.19 110,3222.19 110,4150 545,4585 1780,4585 1910,4455 1910,4341.62 1945,4306.62 1945,4190
Temp2: J1_1.3 U1.15 | length 3496.5
  Top Layer w10: U1.15@155,3095 155,3130 90,3195 90,4155 535,4600 1800,4600 1940,4460 1940,4333.11 J1_1.3@2074.65,4198.46
Temp3: U1.12
Temp4: J1_5.3 U1.1 | length 5273.6
  Top Layer w8: U1.1@105,2872.56 105,2080 25,2000 25,830 350,505 450,505 545,410 545,70 590,25 1865,25 1896.36,56.36 1896.36,652.52 1830.35,718.52 J1_5.3@1830.35,810
Temp5: U1.5
Temp6: J10_5.3 U1.2 | length 3256.2
  Top Layer w8: U1.2@155,2872.56 155,2510 130,2485 130,2072.28 40,1982.28 40,835 355,520 735,520 789.15,574.15 789.15,724.15 865.35,800.35 J10_5.3@865.35,811.54
Temp10: 
Temp11: 
Temp12: 
Temp13: 
Temp24: 
Temp_Sense: TPsck1.TP U1.3 U1R.38 | length 564.7
  Top Layer w8: U1.3@205,2892.24 205,2925 273.52,2993.52 333.52,3053.52 498.52,3053.52 TPsck1.TP@515,3070 546.74,3101.74 566.74,3101.74 v1(567.5,3102.5)
  Top Layer w16: U1.3@205,2872.56 U1.3@205,2892.24
  Bottom Layer w8: v1@570,3100 595.29,3100 595.53,3099.76 614.47,3099.76 617.81,3103.1 640.82,3103.1 U1R.38@643.57,3105.84
TempSel0: U1.11 U1R.39 | length 369.6
  Top Layer w8: U1.11@355,3095 355,3140 370,3155 577.35,3155 592.87,3139.47 592.87,3138.55 605,3126.42 v1(605,3122.63)
  Bottom Layer w8: v1(605,3122.63) 605.92,3121.72 656.73,3121.72 U1R.39@656.79,3121.65
TempSel1: U1.10 U1R.40 | length 285.5
  Top Layer w8: U1.10@405,3095 405,3114.68 426.8,3136.48 487.53,3136.48 494.51,3143.46 534.47,3143.46 547,3130.93 569.07,3130.93 v1(570,3130)
  Bottom Layer w8: v1(570,3130) 571.51,3130 587.02,3145.51 614.47,3145.51 622.58,3137.4 U1R.40@643.57,3137.4
TempSel2: U1.9 U1R.41 | length 236.1
  Top Layer w8: U1.9@455,3095 455,3101.2 463.8,3110 512.45,3110 523.03,3120.58 v1(524.14,3120.58)
  Bottom Layer w8: v1(524.14,3120.58) 524.14,3122.27 558.92,3157.05 619.26,3157.05 625.97,3150.34 640.82,3150.34 643.63,3153.15 U1R.41@656.79,3153.15
TERM_DET_RP2CAN: R1C.2 SW1C.3 U1C.9 | length 716.8
  Top Layer w7.87: v3(540.16,2192.52) 540.16,2397.25 579.53,2436.62 v3(579.53,2594.1)
  Bottom Layer w7.87: v3(540.16,2192.52) 586.23,2146.45 609.1,2146.45 638.11,2117.45 648.43,2117.45 664.17,2101.7 SW1C.3@664.17,2091.38 ; R1C.2@545.67,2562.6 R1C.2@545.67,2566.54 ; U1C.9@545.67,2644.29 R1C.2@545.67,2566.54 ; v3(579.53,2594.1) 558.86,2573.43 552.56,2573.43 R1C.2@545.67,2566.54
USB_N: D5.1 J3.2 R3R.1 | length 339
  Bottom Layer w8: J3.2@285,3343.61 452.75,3343.61 470.81,3325.55 470.81,3319.53 482.4,3307.94 D5.1@482.4,3301.05 490.21,3308.86 490.21,3321.89 519.53,3351.2 R3R.1@570.45,3351.2
USB_P: D5.6 J3.3 R2R.1 | length 310.4
  Bottom Layer w8: J3.3@290,3368.99 465.32,3368.99 477.66,3381.34 477.66,3402.61 D5.6@482.4,3407.35 484.25,3409.2 R2R.1@571.3,3409.2
USB_RP2040_N: R3R.2 U1R.46 | length 224.3
  Bottom Layer w7.87: R3R.2@607.86,3351.2 644.43,3351.2 737.01,3258.62 U1R.46@737.01,3201.87
USB_RP2040_P: R2R.2 U1R.47 | length 267
  Bottom Layer w7.87: R2R.2@608.7,3409.2 752.76,3265.15 U1R.47@752.76,3201.87
XIN_RP2040: C1R.1 U1R.20 Y1R.1 | length 443.1
  Bottom Layer w7.87: U1R.20@815.75,2931.2 815.75,2814.57 847.24,2783.07 896.55,2783.07 910.24,2769.38 910.24,2706.3 876.77,2672.84 Y1R.1@870.87,2672.84 870.87,2633.56 894.59,2609.84 894.59,2587.5 C1R.1@895.87,2586.22
XOUT_RP2040: R1R.1 U1R.21 | length 82.1
  Bottom Layer w7.87: R1R.1@784.25,2857.95 788.19,2857.95 800,2869.76 U1R.21@800,2931.2
pads on no net: D5.3 D5.4 J1_1. J1_5. J1R.A J1R.B J1R.C J1R.D J1R.E J1R.F J1R.G J2. J2.6 J3.1 J3.4 J4. J4.6 J5. J6.1 J7.1 J8.1 J9.1 J10.8 J10_1. J10_5. SW1R.A1 SW2R.A2 U1.4 U1C.3 U1C.5 U1C.8 U2_1.2 U2_1.11 U2_1.12 U2_1.13 U2_1.14 U2_1.15 U2_1.19 U2_1.21 U2_1.27 U2_1.29 U2_1.32 U2_1.33 U2_1.34 U2_1.36 U2_1.39 U2_2.2 U2_2.11 U2_2.12 U2_2.13 U2_2.14 U2_2.15 U2_2.19 U2_2.21 U2_2.27 U2_2.29 U2_2.32 U2_2.33 U2_2.34 U2_2.36 U2_2.39 U2_3.2 U2_3.11 U2_3.12 U2_3.13 U2_3.14 U2_3.15 U2_3.19 U2_3.21 U2_3.27 U2_3.29 U2_3.32 U2_3.33 U2_3.34 U2_3.36 U2_3.39 U2_5.2 U2_5.11 U2_5.12 U2_5.13 U2_5.14 U2_5.15 U2_5.19 U2_5.21 U2_5.27 U2_5.29 U2_5.32 U2_5.33 U2_5.34 U2_5.36 U2_5.39
copper on no net: | length 1996.6
  Top Layer w7.87: 780,3284.84 784.25,3289.1
  Top Layer w15.75: 553.54,3021.66 570.2,3005 580.91,2994.29 654.33,2994.29 655.02,2994.98 689.76,2994.98 ; 666.14,2885.43 690.16,2909.45 690.16,2944.91 689.76,2945.3 689.76,2987.8 697.64,2995.67 ; 811.92,2926.18 811.92,2969.36 812.42,2969.86
  Top Layer w20: 210,2704.2 340,2704.2
  Top Layer w23.62: 780,3284.84 780,3278.83 789.25,3269.58 789.25,3239.95 790,3239.2
  Top Layer w45.28: v7(469.29,2247.64) 493.11,2223.82 493.11,2174.18 520.04,2147.24 816.05,2147.24 851.86,2183.05 v7(875.67,2183.05) ; 593.51,3294.88 744.21,3294.88 750,3289.1 784.25,3289.1 807.51,3289.1 847.24,3328.83 847.24,3487.99
  Bottom Layer w7.87: 656.79,3027.17 676.6,3027.17 693.87,3009.9 693.87,2999.44 697.64,2995.67 ; 768.5,3201.87 768.5,3229.98 777.73,3239.2 785,3239.2 ; 784.25,2931.2 784.25,2956.3 794.05,2966.1 808.65,2966.1 809.97,2967.41 ; 784.25,3201.87 784.25,3238.45 785,3239.2 ; 790,3239.2 785,3239.2 ; 812.42,2969.86 809.97,2967.41 ; 927.46,3027.17 907.65,3027.17 898.43,3017.94 898.43,3001.7 898.43,2975.99 887.94,2965.5 811.87,2965.5 809.97,2967.41
  Bottom Layer w9.84: 774.47,3487.99 847.24,3487.99 ; 1061.81,2688.58 1061.52,2688.29 1061.52,2635.87 1063.92,2633.47
  Bottom Layer w10: 1061.8,2633.47 1063.92,2633.47
  Bottom Layer w15.75: 719.42,3470.45 733.14,3470.45 750.68,3487.99 774.47,3487.99

## Polygon pours and split planes (outlines as drawn)
_V+ on Bottom Layer "_V+_L04_P045" (solid, pour order 45): 2080,4025 2017.5,4025 2017.5,3945 2080,3945
_V+ on Bottom Layer "_V+_L04_P044" (solid, pour order 44): 2025,3225 2025,3287.5 1945,3287.5 1945,3225
_V+ on Bottom Layer "_V+_L04_P043" (solid, pour order 43): 2025,2940 2025,3002.5 1945,3002.5 1945,2940
_V+ on Bottom Layer "_V+_L04_P042" (solid, pour order 42): 2135,2025 2135,2087.5 2055,2087.5 2055,2025
_V+ on Bottom Layer "_V+_L04_P041" (solid, pour order 41): 1890,2280 1952.5,2280 1952.5,2360 1890,2360
_V+ on Bottom Layer "_V+_L04_P040" (solid, pour order 40): 2235,1600 2235,1537.5 2315,1537.5 2315,1600
_V+ on Bottom Layer "_V+_L04_P039" (solid, pour order 39): 2035,1030 2035,967.5 2115,967.5 2115,1030
_V+ on Bottom Layer "_V+_L04_P038" (solid, pour order 38): 1795,1060 1795,997.5 1875,997.5 1875,1060
_V+ on Bottom Layer "_V+_L04_P037" (solid, pour order 37): 1190,1255 1190,1192.5 1270,1192.5 1270,1255
_V+ on Bottom Layer "_V+_L04_P036" (solid, pour order 36): 595,1100 595,1037.5 675,1037.5 675,1100
_V+ on Bottom Layer "_V+_L04_P035" (solid, pour order 35): 560,1580 560,1517.5 640,1517.5 640,1580
3V3 on Bottom Layer "3V3_L04_P001" (solid, remove dead copper, pour order 1): 1070.8,3570 1070.8,3617.03 1070.8,3940 975.8,3940 975.8,3625 975.8,3570
3V3 on Bottom Layer "3V3_L04_P000" (solid, remove dead copper, pour order 0): 200,3034.51 651.06,3576.87 1179.49,3576.87 1179.49,2126.66 205,2135
GND_RP2CAN on Top Layer "GND_RP2CAN_L01_P019" (solid, pour order 19): 2500,595 2580,595 2580,500 2500,500
GND_RP2CAN on Top Layer "GND_RP2CAN_L01_P048" (solid, pour order 48): 725,1770 645,1770 645,1845 725,1845
GND_RP2CAN on Top Layer "GND_RP2CAN_L01_P031" (solid, pour order 31): 1902.36,2637.36 1978.04,2569.06 1930.9,2515.32 1851.88,2586.88
_V+ on Top Layer "_V+_L01_P046" (solid, remove dead copper, pour order 46): 1650,4135 1660,4125 2445,4125 2445,780 2375,710 50,710 50,1860 1065,1860 1065,3815 1360,4110
GND_RP2CAN on Top Layer "GND_RP2CAN_L01_P034" (solid, pour order 34): 1470,3791 1620,3791 1620,3758.67 1470,3758.67
GND_RP2CAN on Top Layer "GND_RP2CAN_L01_P032" (solid, pour order 32): 1992.36,3847.36 2068.04,3779.06 2020.9,3725.32 1941.88,3796.88
GND_RP2CAN on Top Layer "GND_RP2CAN_L01_P030" (solid, pour order 30): 1640,2520 1578.03,2431.48 1531.4,2466.45 1597.6,2550.29
GND_RP2CAN on Top Layer "GND_RP2CAN_L01_P029" (solid, pour order 29): 2323.75,1380 2300,1260 2270,1260 2200,1315 2196.25,1380
GND_RP2CAN on Top Layer "GND_RP2CAN_L01_P026" (solid, pour order 26): 1895,1180 1895,1100 1800,1100 1800,1180
GND_RP2CAN on Top Layer "GND_RP2CAN_L01_P025" (solid, pour order 25): 1250,1040 1170,1040 1170,1135 1250,1135
GND_RP2CAN on Top Layer "GND_RP2CAN_L01_P024" (solid, pour order 24): 705,1375 625,1375 625,1470 705,1470
GND_RP2CAN on Top Layer "GND_RP2CAN_L01_P023" (solid, pour order 23): 2740,3850 2740,3930 2835,3930 2835,3850
GND_RP2CAN on Top Layer "GND_RP2CAN_L01_P022" (solid, pour order 22): 1870,3145 1790,3145 1790,3240 1870,3240
GND_RP2CAN on Top Layer "GND_RP2CAN_L01_P021" (solid, pour order 21): 370,710 370,790 465,790 465,710
GND_RP2CAN on Top Layer "GND_RP2CAN_L01_P020" (solid, pour order 20): 1200,435 1200,355 1105,355 1105,435
GND_RP2CAN on Top Layer "GND_RP2CAN_L01_P018" (solid, pour order 18): 2690,790 2770,790 2770,695 2690,695
GND_RP2CAN on Top Layer "GND_RP2CAN_L01_P017" (solid, pour order 17): 2675,2415 2675,2495 2770,2495 2770,2415
GND_RP2CAN on Top Layer "GND_RP2CAN_L01_P016" (solid, pour order 16): 1790,1695 1870,1695 1870,1600 1790,1600
Out2_3 on Top Layer "OUT2_3_L01_P015" (solid, pour order 15): 2070,598.53 1970,598.53 1970,821.11 1946.06,950 1910,993.94 1910,1180 1990,1180 1990,1145 1990,993.94 2030,950 2051.82,821.11
Out1_3 on Top Layer "OUT1_3_L01_P014" (solid, pour order 14): 2465,1215 2220,1215 2140,1295 2140,1330 2165,1330 2240,1255 2335.28,1255 2340,1425 2465,1425
Out2_2 on Top Layer "OUT2_2_L01_P013" (solid, pour order 13): 1515,2180 1515,2330.2 1661.8,2539.49 1700,2539.49 1725,2180
Out1_2 on Top Layer "OUT1_2_L01_P011" (solid, pour order 11): 2135,2695 1785,2695 1785,2685 1870,2685 2025,2530 2025,2485 2135,2485
Out2_1 on Top Layer "OUT2_1_L01_P010" (solid, pour order 10): 1395,3590 1395,3755 1720,3755 1755,3755 1755,3740 1605,3590
Out1_1 on Top Layer "OUT1_1_L01_P009" (solid, pour order 9): 2215,3910 1865,3910 1865,3900 1950,3900 2105,3745 2105,3700 2215,3700
Out1_5 on Top Layer "OUT1_5_L01_P008" (solid, pour order 8): 1370,845 1160,845 1160,985 976.97,985 976.97,1028.03 1370,1028.03
Out2_5 on Top Layer "OUT2_5_L01_P007" (solid, pour order 7): 200,1275 694.17,1275 700,1280 745,1325 659.23,1365 200,1365
GND_RP2CAN on GND2 (split plane): 2661.56,4979.63 2674.41,4978.54 2687.19,4976.74 2699.84,4974.22 2712.33,4971 2724.62,4967.08 2736.68,4962.48 2748.45,4957.21 2759.91,4951.29 2771.02,4944.74 2781.75,4937.57 2792.06,4929.81 2801.91,4921.49 2811.29,4912.63 2820.15,4903.25 2828.48,4893.4 2836.23,4883.09 2843.4,4872.36 2849.95,4861.25 2855.88,4849.79 2861.14,4838.01 2865.75,4825.96 2869.66,4813.67 2872.89,4801.18 2875.4,4788.52 2877.21,4775.75 2878.29,4762.9 2878.63,4750.61 2878.58,4750 2878.56,4750 2878.57,4749.92 2878.57,4749.84 2878.77,4747.95 2878.95,4746.08 2878.97,4746 2878.98,4745.92 2879.55,4744.12 2879.9,4742.94 2879.9,251.2 2879.79,250 2879.85,249.31 2879.51,237.1 2878.43,224.25 2876.62,211.48 2874.11,198.82 2870.88,186.33 2866.97,174.04 2862.37,161.99 2857.1,150.21 2851.18,138.75 2844.62,127.64 2837.45,116.91 2829.7,106.6 2821.37,96.75 2812.51,87.37 2803.14,78.51 2793.28,70.19 2782.97,62.43 2772.24,55.26 2761.13,48.71 2749.67,42.79 2737.9,37.52 2725.84,32.92 2713.55,29 2701.06,25.78 2688.41,23.26 2675.63,21.46 2662.78,20.37 2650.57,20.03 2649.88,20.1 250,20.1 249.31,20.03 237.1,20.37 224.25,21.46 211.48,23.26 198.82,25.78 186.33,29 174.04,32.92 161.99,37.52 150.21,42.79 138.75,48.71 127.64,55.26 116.91,62.43 106.6,70.19 96.75,78.51 87.37,87.37 78.51,96.75 70.19,106.6 62.43,116.91 55.26,127.64 48.71,138.75 42.79,150.21 37.52,161.99 32.92,174.04 29,186.33 25.78,198.82 23.26,211.48 21.46,224.25 20.37,237.1 20.03,249.31 20.1,250 20.1,4750 20.03,4750.69 20.37,4762.9 21.46,4775.75 23.26,4788.52 25.78,4801.18 29,4813.67 32.92,4825.96 37.52,4838.01 42.79,4849.79 48.71,4861.25 55.26,4872.36 62.43,4883.09 70.19,4893.4 78.51,4903.25 87.37,4912.63 96.75,4921.49 106.6,4929.81 116.91,4937.57 127.64,4944.74 138.75,4951.29 150.21,4957.21 161.99,4962.48 174.04,4967.08 186.33,4971 198.82,4974.22 211.48,4976.74 224.25,4978.54 237.1,4979.63 249.31,4979.97 250,4979.9 2648.66,4979.9 2649.35,4979.97
GND_RP2CAN on GND1 (split plane): 2661.56,4979.63 2674.41,4978.54 2687.19,4976.74 2699.84,4974.22 2712.33,4971 2724.62,4967.08 2736.68,4962.48 2748.45,4957.21 2759.91,4951.29 2771.02,4944.74 2781.75,4937.57 2792.06,4929.81 2801.91,4921.49 2811.29,4912.63 2820.15,4903.25 2828.48,4893.4 2836.23,4883.09 2843.4,4872.36 2849.95,4861.25 2855.88,4849.79 2861.14,4838.01 2865.75,4825.96 2869.66,4813.67 2872.89,4801.18 2875.4,4788.52 2877.21,4775.75 2878.29,4762.9 2878.63,4750.61 2878.58,4750 2878.56,4750 2878.57,4749.92 2878.57,4749.84 2878.77,4747.95 2878.95,4746.08 2878.97,4746 2878.98,4745.92 2879.55,4744.12 2879.9,4742.94 2879.9,251.2 2879.79,250 2879.85,249.31 2879.51,237.1 2878.43,224.25 2876.62,211.48 2874.11,198.82 2870.88,186.33 2866.97,174.04 2862.37,161.99 2857.1,150.21 2851.18,138.75 2844.62,127.64 2837.45,116.91 2829.7,106.6 2821.37,96.75 2812.51,87.37 2803.14,78.51 2793.28,70.19 2782.97,62.43 2772.24,55.26 2761.13,48.71 2749.67,42.79 2737.9,37.52 2725.84,32.92 2713.55,29 2701.06,25.78 2688.41,23.26 2675.63,21.46 2662.78,20.37 2650.57,20.03 2649.88,20.1 250,20.1 249.31,20.03 237.1,20.37 224.25,21.46 211.48,23.26 198.82,25.78 186.33,29 174.04,32.92 161.99,37.52 150.21,42.79 138.75,48.71 127.64,55.26 116.91,62.43 106.6,70.19 96.75,78.51 87.37,87.37 78.51,96.75 70.19,106.6 62.43,116.91 55.26,127.64 48.71,138.75 42.79,150.21 37.52,161.99 32.92,174.04 29,186.33 25.78,198.82 23.26,211.48 21.46,224.25 20.37,237.1 20.03,249.31 20.1,250 20.1,4750 20.03,4750.69 20.37,4762.9 21.46,4775.75 23.26,4788.52 25.78,4801.18 29,4813.67 32.92,4825.96 37.52,4838.01 42.79,4849.79 48.71,4861.25 55.26,4872.36 62.43,4883.09 70.19,4893.4 78.51,4903.25 87.37,4912.63 96.75,4921.49 106.6,4929.81 116.91,4937.57 127.64,4944.74 138.75,4951.29 150.21,4957.21 161.99,4962.48 174.04,4967.08 186.33,4971 198.82,4974.22 211.48,4976.74 224.25,4978.54 237.1,4979.63 249.31,4979.97 250,4979.9 2648.66,4979.9 2649.35,4979.97

## Keep-outs
Keep-Out Layer:
  region: 2395.45,253.34 cw(c2645.45,253.34) 2645.45,503.34 2895.45,503.34 2895.45,253.34 cw(c2645.45,253.34) 2645.45,3.34 2395.45,3.34
  region: 2645.64,4996.51 cw(c2645.64,4746.51) 2895.64,4746.51 2895.64,4496.51 2645.64,4496.51 cw(c2645.64,4746.51) 2395.64,4746.51 2395.64,4996.51
  region: 252.11,4994.41 ccw(c252.11,4744.41) 2.11,4744.41 2.11,4494.41 252.11,4494.41 ccw(c252.11,4744.41) 502.11,4744.41 502.11,4994.41
  region: 505,255 ccw(c255,255) 255,505 5,505 5,255 ccw(c255,255) 255,5 505,5
  lines w10: 2648.66,5000 cw(c2648.66,4750) 2898.66,4750 ; 2649.88,5000 250,5000 ccw(c250,4750) 0,4750 0,250 ccw(c250,250) 250,0 2649.88,0 ccw(c2649.88,250) 2899.88,250 ; 2900,250 2900,4748.03

## Other copper
Bottom Layer:
  pour cut-out: 901.8,3084.79 901.58,3084.57 684.83,3084.57 684.83,3137.18 712.15,3164.5 784.76,3164.5 799.83,3179.57 899.83,3179.57
  pour cut-out: 278.94,2654.57 278.94,2864.57 283.94,2869.57 533.94,2869.57 533.94,2729.57 473.94,2639.57
  pour cut-out: 656.09,2283.99 666.83,2288.05 699.72,2288.05 705.78,2281.99 705.78,2251.99 680.78,2251.99 670.78,2261.99
  pour cut-out: 914.62,2786.76 914.66,2786.72 935.05,2786.72 933.93,2586.15 922.42,2574.63 917.77,2574.63 917.77,2610.2 893.71,2634.26 893.71,2656.42 908.73,2671.44 908.73,2681.44
  pour cut-out: 794.71,2994.57 844.71,2944.57 889.71,2944.57 889.71,3034.57 854.71,3034.57

## Silkscreen, mask and mechanical layers (free items; w line width, h text height)
Bottom Overlay:
  drawing of 19 lines, arcs and shapes, not listed
  text "BOOT" at 1128.45,2525.67 h40 r90
  text "RESET" at 1128.45,2309.45 h40 r90
  text "TERM / ON" at 483.93,2081.85 h40 r90
  text "The Underwater Robotics Team" at 2280,220 h60
  text "LED Control V2" at 2265,105 h60